# Altium PCB diff_probe.PcbDoc
Units mm, origin at the board's own origin, x right, y up, seen from the top; angles counter-clockwise.
Board outline 47.37 x 13.34 mm, 2 copper layers (Top Layer, Bottom Layer); 60 components, 36 nets, 183 pads, 7 vias.
Unrouted connection lines stored in the file: 139.
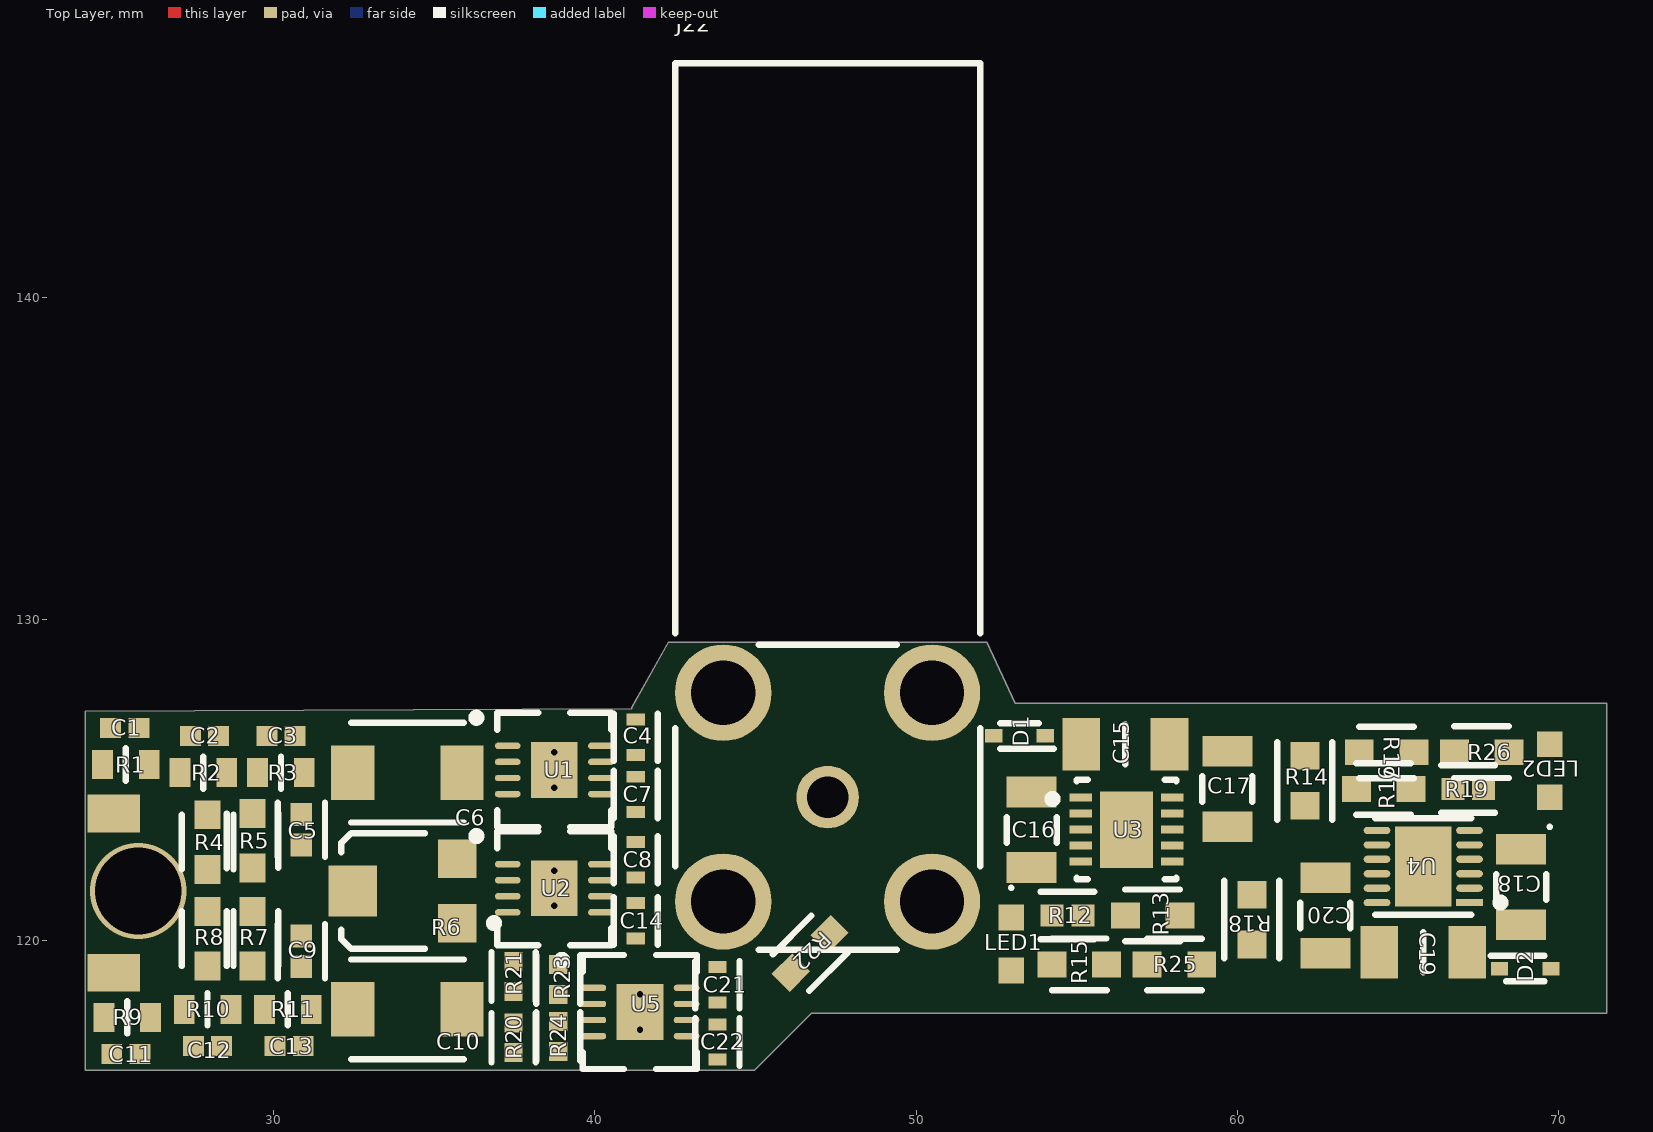
[diagram p0: Top Layer view]
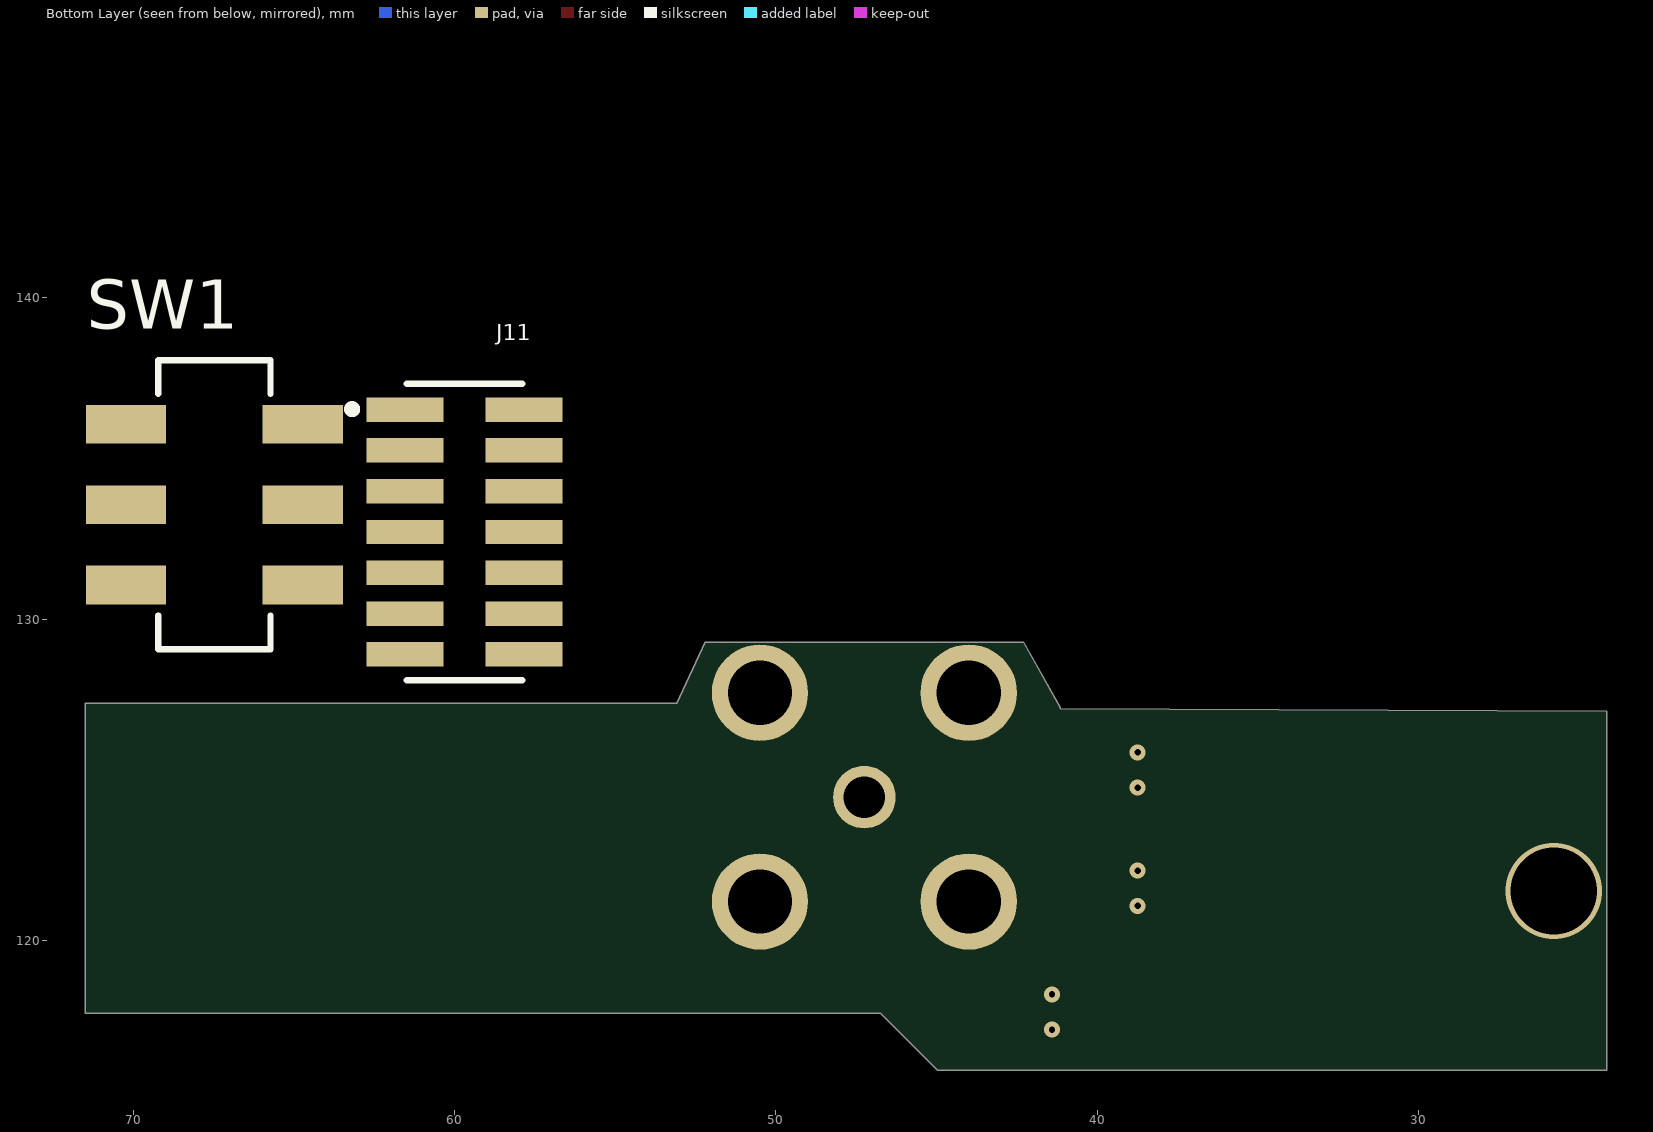
[diagram p1: Bottom Layer view, seen from below]

## Layer stack, top to bottom
Top Solder: solder mask 0.0102, Solder Resist, Dk 3.5
Top Layer: signal copper 0.0356
Dielectric 1: dielectric 0.32, FR-4, Dk 4.8
Bottom Layer: signal copper 0.0356
Bottom Solder: solder mask 0.0102, Solder Resist, Dk 3.5

## Board outline
44.958,115.951 46.736,117.729 71.501,117.729 71.501,127.378 53.086,127.378 52.197,129.286 42.291,129.286 41.15,127.256 41.15,127.217 24.13,127.127 24.13,115.951

## Design rules (kind name [scope] priority, off if disabled: settings)
Clearance [All] p1: gap=0.254 ignorepadtopadclearanceinfootprint=FALSE
PolygonConnect [All] p1: connectstyle=Relief reliefconductorwidth=0.254 reliefentries=4 polygonreliefangle="90 Angle" airgapwidth=0.254
RoutingVias [All] p1: holewidth=0.711 width=1.27 viastyle="Through Hole" minholewidth=0.711 minwidth=1.27 maxholewidth=0.711 maxwidth=1.27
SolderMaskExpansion [All] p1: expansion=0 istentingtop=FALSE
SupplyNets "Schematic Supply Nets_2" [InNet('-3,3')] p1: voltage=0.000
SupplyNets "Schematic Supply Nets_1" [InNet('+3,3')] p2: voltage=0.000
SupplyNets "Schematic Supply Nets" [InNet('GND')] p3: voltage=0.000
Width [All] p1: maxlimit=0.254 minlimit=0.254 preferedwidth=0.254
30 further rules are at their usual default settings.

## Classes and differential pairs
component class U_supply: C15 C16 C17 C18 C19 C20 D1 D2 J11 LED1 LED2 R12 R13 R14 R15 R16 R17 R18 R19 R25 R26 SW1 U3 U4
component class U_diff_amp: 2 C21 C22 J22 R20 R21 R22 R23 R24 U5
component class U_attenuation_stage: C1 C2 C3 C4 C5 C6 C7 C8 C9 C10 C11 C12 C13 C14 R1 R2 R3 R4 R5 R6 R7 R8 R9 R10 R11 U1 U2

## Components (designator, comment, footprint, x,y, rotation, side; value= is the part's Value field where it differs from the comment)
C1 "C0402C100C5GACAUTO" CAPC1005X65N 25.363,126.619 r0 top
C2 "C0402C100C5GACAUTO" CAPC1005X65N 27.844,126.365 r0 top
C3 "C0402C100C5GACAUTO" CAPC1005X65N 30.226,126.365 r0 top
C4 "CGA2B3X7R1E104K050BB" FP-CGA2B-IPC_B 41.275,126.323 r270 top
C5 "GRT1555C1H511FA02D" FP-GRT155-0_05-IPC_A 30.861,123.444 r270 top
C6 "JR200" CAPM3531X35N 34.163,125.222 r180 top
C7 "CGA2B3X7R1E104K050BB" FP-CGA2B-IPC_B 41.275,124.545 r90 top
C8 "CGA2B3X7R1E104K050BB" FP-CGA2B-IPC_B 41.275,122.513 r270 top
C9 "GRT1555C1H511FA02D" FP-GRT155-0_05-IPC_A 30.861,119.663 r270 top
C10 "JR200" CAPM3531X35N 34.163,117.856 r0 top
C11 "C0402C100C5GACAUTO" CAPC1005X65N 25.4,116.459 r0 top
C12 "C0402C100C5GACAUTO" CAPC1005X65N 27.94,116.713 r180 top
C13 "C0402C100C5GACAUTO" CAPC1005X65N 30.48,116.713 r0 top
C14 "CGA2B3X7R1E104K050BB" FP-CGA2B-IPC_B 41.275,120.608 r90 top
C15 "MCASE31LBB7226MTNA01" CAPC3214X190N 56.515,126.111 r0 top
C16 "CGA4J1X7R1E475K125AE" FP-CGA4J-IPC_A 53.594,123.444 r270 top
C17 "CGA4J1X7R1E475K125AE" FP-CGA4J-IPC_A 59.69,124.714 r90 top
C18 "CGA4J1X7R1E475K125AE" FP-CGA4J-IPC_A 68.834,121.666 r270 top
C19 "MCASE31LBB7226MTNA01" CAPC3214X190N 65.786,119.634 r0 top
C20 "CGA4J1X7R1E475K125AE" FP-CGA4J-IPC_A 62.738,120.777 r270 top
C21 "CGA2B3X7R1E104K050BB" FP-CGA2B-IPC_B 43.815,118.618 r270 top
C22 "CGA2B3X7R1E104K050BB" FP-CGA2B-IPC_B 43.815,116.84 r90 top
D1 "RB521S-30" SODFL1608X77N 53.213,126.365 r180 top
D2 "RB521S-30" SODFL1608X77N 68.961,119.126 r0 top
J11 "62101421021" 62101421021 59.69,132.715 r270 bottom
J22 "60711002241501" 60711002241501 -1222.756,1394.46 r90 top
LED1 "APT1608SEC_J3-AMT" APT1608SECJ3AMT 52.959,119.888 r270 top
LED2 "APT1608SEC_J3-AMT" APT1608SECJ3AMT 69.723,125.285 r90 top
R1 "ERA-3AEB334V" FP-ERA3A-MFG 25.4,125.476 r0 top
R2 "ERA-3AEB334V" FP-ERA3A-MFG 27.813,125.222 r0 top
R3 "ERA-3AEB334V" FP-ERA3A-MFG 30.226,125.222 r0 top
R4 "RT0603BRD076K49L" FP-RT0603-MFG 27.94,123.063 r90 top value=6.49KΩ
R5 "RT0603BRD0721R5L" FP-RT0603-MFG 29.337,123.102 r90 top value=21.5Ω
R6 "TC33X-2-103E" BOUR-TC33X-2_V 33.909,121.539 r180 top
R7 "RT0603BRD0721R5L" FP-RT0603-MFG 29.337,120.054 r90 top value=21.5Ω
R8 "RT0603BRD076K49L" FP-RT0603-MFG 27.94,120.054 r90 top value=6.49KΩ
R9 "ERA-3AEB334V" FP-ERA3A-MFG 25.437,117.602 r0 top
R10 "ERA-3AEB334V" FP-ERA3A-MFG 27.94,117.856 r180 top
R11 "ERA-3AEB334V" FP-ERA3A-MFG 30.443,117.856 r0 top
R12 "AC0402FR-7W1K2L" FP-AC0402-IPC_A 54.708,120.777 r0 top
R13 "RT0603BRE07100KL" FP-RT0603-MFG 57.365,120.777 r180 top value=100KΩ
R14 "AT0603FRE0733K2L" FP-AT0603-IPC_B 62.103,124.968 r90 top
R15 "RT0603BRD1310KL" FP-RT0603-MFG 55.079,119.253 r180 top value=10KΩ
R16 "RT0603BRE07100KL" FP-RT0603-MFG 64.555,124.714 r180 top value=100KΩ
R17 "RT0603BRD1310KL" FP-RT0603-MFG 64.643,125.857 r0 top value=10KΩ
R18 "AT0603FRE0733K2L" FP-AT0603-IPC_B 60.452,120.65 r270 top
R19 "AC0402FR-7W1K2L" FP-AC0402-IPC_A 67.183,124.714 r180 top
R20 "RG1005N-4020-W-T5" FP-RG1005-IPC_B 37.465,116.969 r270 top
R21 "RG1005N-4020-W-T5" FP-RG1005-IPC_B 37.465,118.874 r270 top
R22 "RT0603BRE0749R9L" FP-RT0603-MFG 46.702,119.6 r45 top value=49.9Ω
R23 "RG1005N-4020-W-T5" FP-RG1005-IPC_B 38.862,118.786 r270 top
R24 "RG1005N-4020-W-T5" FP-RG1005-IPC_B 38.862,117.008 r90 top
R25 "RT0603BRE07100KL" FP-RT0603-MFG 58.039,119.253 r0 top value=100KΩ
R26 "RT0603BRE07100KL" FP-RT0603-MFG 67.603,125.857 r180 top value=100KΩ
SW1 "452406020024" 452406020024 67.481,133.564 r270 bottom
U1 "ADA4817-1ACPZ-R7" ADI-CP-8-2_L 38.735,125.307 r0 top
U2 "ADA4817-1ACPZ-R7" ADI-CP-8-2_L 38.735,121.624 r0 top
U3 "LT3045EDD#PBF" FP-LT3045EDD#PBF-MFG 56.543,123.452 r0 top
U4 "LT3094EDD#PBF" FP-DD-12-05-08-1725-IPC_B 65.786,122.301 r180 top
U5 "ADA4817-1ACPZ-R7" ADI-CP-8-2_L 41.402,117.772 r0 top

## Footprints (in the part's own frame and the unit in brackets; to place one, negate y for a bottom-side part, rotate by r counter-clockwise, add the part's x,y. Pads: shape width x height; smd on the part's side, far side on the other; paste and mask are expansions set on the pad)
62101421021 [mm] "Pin Header, pitch 1.27 mm, SMD, Vertical, dual row, 14p"
  rect 0.76x2.4 smd: 1(-3.81,-1.85) 2(-3.81,1.85) 3(-2.54,-1.85) 4(-2.54,1.85) 5(-1.27,-1.85) 6(-1.27,1.85) 7(0,-1.85) 8(0,1.85) 9(1.27,-1.85) 10(1.27,1.85) 11(2.54,-1.85) 12(2.54,1.85) 13(3.81,-1.85) 14(3.81,1.85)
  silkscreen extent -4.62,-3.63 4.62,1.8, body extent -4.44,-2.5 4.45,2.5, height 5.9
452406020024 [mm] "SMT Mini Slide Switch, Same Side Connection, body 9.00 x 3.50 mm"
  rect 1.2x2.5 smd: 1(2.5,2.75) 2(0,2.75) 3(-2.5,2.75) 4(2.5,-2.75) 5(0,-2.75) 6(-2.5,-2.75)
  silkscreen extent -4.5,-1.75 4.5,1.75, body extent -4.52,-3.75 4.52,3.75, height 5.5
60711002241501 [mm] "BNC PCB THT Jack"
  round 1.95 hole 1.3: 1(-1270,-1270)
  round 3 hole 2: 2(-1273.25,-1266.75) 3(-1266.75,-1266.75) 4(-1266.75,-1273.25) 5(-1273.25,-1273.25)
  silkscreen extent -1274.75,-1274.75 -1247.15,-1265.25, body extent -1274.75,-1274.85 -1247.15,-1265.15, height 12
ADI-CP-8-2_L [mm] "QFN, 8-Leads, Body 3x3mm, Pitch 0.5mm, Thermal Pad 1.45X1.74mm, IPC High Density"
  oval 0.8x0.2 smd: 1(-1.45,0.75) 2(-1.45,0.25) 3(-1.45,-0.25) 4(-1.45,-0.75) 5(1.45,-0.75) 6(1.45,-0.25) 7(1.45,0.25) 8(1.45,0.75)
  rect 1.45x1.74 smd: 9(0,0)
  silkscreen extent -2.55,-1.78 1.78,1.78, body extent -1.63,-1.63 1.63,1.63, height 0.9
APT1608SECJ3AMT [mm]
  rect 0.8x0.8 smd: 1(-0.825,0) 2(0.825,0)
  silkscreen extent -1.8,-0.05 -1.7,0.05, body extent -0.8,-0.4 0.81,0.4, height 0.75
BOUR-TC33X-2_V [mm] "SMD, 3-Leads, Body 3.8x3.6mm"
  rect 1.2x1.2 smd: 1(-1.8,1) 3(-1.8,-1)
  rect 1.5x1.6 smd: 2(1.45,0)
  silkscreen extent -3.08,-1.8 1.8,1.8, body extent -2,-1.8 1.96,1.8, height 1.15
CAPC1005X65N [mm]
  rect 0.65x0.62 smd: 1(-0.44,0) 2(0.44,0)
  body extent -0.5,-0.25 0.5,0.25, height 0.65
CAPC3214X190N [mm]
  rect 1.17x1.63 smd: 1(-1.37,0) 2(1.37,0)
  silkscreen extent 0,-0.63 0,0.63, body extent -1.6,-0.72 1.6,0.72, height 1.9
CAPM3531X35N [mm]
  rect 1.35x1.7 smd: 1(-1.7,0) 2(1.7,0)
  silkscreen extent -1.75,-1.55 1.75,1.55, body extent -1.75,-1.55 1.75,1.55, height 0.35
FP-AC0402-IPC_A [mm]
  rect 0.715x0.672 smd paste+0 mask+0: 1(-0.479,0) 2(0.479,0)
  silkscreen extent -0.84,-0.74 0.84,0.74, body extent -1.04,-0.54 1.04,0.54, height 0.25
FP-AT0603-IPC_B [mm]
  rect 0.859x0.912 smd paste+0 mask+0: 1(-0.777,0) 2(0.777,0)
  silkscreen extent -1.21,-0.86 1.21,0.86, body extent -1.46,-0.71 1.46,0.71, height 0.25
FP-CGA2B-IPC_B [mm]
  rect 0.372x0.572 smd paste+0 mask+0: 1(-0.55,0) 2(0.55,0)
  silkscreen extent -0.74,-0.69 0.74,0.69, body extent -0.89,-0.44 0.89,0.44, height 0.25
FP-CGA4J-IPC_A [mm]
  rect 0.956x1.556 smd paste+0 mask+0: 1(-1.175,0) 2(1.175,0)
  silkscreen extent -0.4,-0.78 0.4,0.78, body extent -2.15,-1.28 2.15,1.28, height 0.25
FP-DD-12-05-08-1725-IPC_B [mm]
  rect 0.831x0.222 smd paste+0 mask+0: 1(-1.441,1.125)
  rrect100% 0.831x0.222 smd paste+0 mask+0: 2(-1.441,0.675) 3(-1.441,0.225) 4(-1.441,-0.225) 5(-1.441,-0.675) 6(-1.441,-1.125) 7(1.441,-1.125) 8(1.441,-0.675) 9(1.441,-0.225) 10(1.441,0.225) 11(1.441,0.675) 12(1.441,1.125)
  rect 1.75x2.48 smd paste-1000 mask+0: 13(0,0)
  silkscreen extent -2.53,-1.5 1.5,1.5, body extent -2.11,-1.75 2.11,1.75, height 0.25
FP-ERA3A-MFG [mm]
  rect 0.65x0.9 smd paste+0 mask+0: 1(-0.725,0) 2(0.725,0)
  silkscreen extent 0,-0.5 0,0.5, body extent -1.15,-0.6 1.15,0.6, height 0.25
FP-GRT155-0_05-IPC_A [mm]
  rect 0.715x0.672 smd paste+0 mask+0: 1(-0.479,0) 2(0.479,0)
  silkscreen extent -0.84,-0.74 0.84,0.74, body extent -1.04,-0.54 1.04,0.54, height 0.25
FP-LT3045EDD#PBF-MFG [mm]
  rect 0.7x0.25 smd paste+0 mask+0: 1(-1.425,1) 2(-1.425,0.5) 3(-1.425,0) 4(-1.425,-0.5) 5(-1.425,-1) 6(1.425,-1) 7(1.425,-0.5) 8(1.425,0) 9(1.425,0.5) 10(1.425,1)
  rect 1.65x2.38 smd paste+0 mask+0: 11(0,0)
  silkscreen extent -2.42,-1.55 1.55,1.55, body extent -1.88,-1.65 1.88,1.65, height 0.25
FP-RG1005-IPC_B [mm]
  rect 0.589x0.572 smd paste+0 mask+0: 1(-0.464,0) 2(0.464,0)
  silkscreen extent -0.76,-0.69 0.76,0.69, body extent -0.91,-0.44 0.91,0.44, height 0.25
FP-RT0603-MFG [mm]
  rect 0.9x0.8 smd paste+0 mask+0: 1(-0.85,0) 2(0.85,0)
  silkscreen extent -0.85,-0.81 0.86,0.8, body extent -1.4,-0.55 1.4,0.55, height 0.25
SODFL1608X77N [mm]
  rect 0.54x0.42 smd: 1(-0.8,0) 2(0.8,0)
  silkscreen extent -1.07,-0.4 0.6,0.4, body extent -0.8,-0.4 0.8,0.4, height 0.77

## Part data
C1 C2 C3 C11 C12 C13: "Capacitor", Manufacturer_Name="Yageo Group", Mouser Part Number=80-C0402C100C5GAUTO, Arrow Part Number=C0402C100C5GACAUTO, Arrow Price/Stock=https://www.arrow.com/en/products/c0402c100c5gacauto/kemet-corporation?region=nac, Datasheet Link=https://www.arrow.com/en/products/c0402c100c5gacauto/kemet-corporation?region=nac, Height=0.65mm, Manufacturer_Part_Number=C0402C100C5GACAUTO, Mouser Price/Stock=https://www.mouser.co.uk/ProductDetail/KEMET/C0402C100C5GACAUTO?qs=jI8Gez59nxIdSgXSmqmKxg%3D%3D
C4 C7 C8 C14 C21 C22: library part CMP-2000-06086-2, "Cap Ceramic 100nF 25V X7R 10% Pad SMD 0402 +125°C Automotive T/R", Capacitance=100nF, Case Code (Imperial)=0402, Case Code (Metric)=1005, Dielectric=X7R, Max Operating Temperature=125°C, Min Operating Temperature=-55°C, Package Quantity=1, Ratings=AEC-Q200, Tolerance=10%, Voltage=25V, Case/Package=0402, Composition=Ceramic, Depth=0.5mm, Height=0.5mm, Lead Free="Lead Free", Length=1mm, Mount="Surface Mount", Packaging="Tape and Reel", REACH SVHC="No SVHC", Termination=SMD/SMT, Thickness=0.022inch, Voltage Rating=25V, Voltage Rating (DC)=25V, Weight=2.3E-05oz, Width=0.02inch
C5 C9: library part CMP-06035-032859-1, "Multi-Layer Ceramic Capacitor 510pF 50V C0G ±1% 0402 Paper T/R"
C6 C10: "Capacitor", Manufacturer_Name=Knowles, Mouser Part Number=768-JR200, Datasheet Link=https://datasheet.datasheetarchive.com/originals/distributors/DKDS-39/7593.pdf, Height=0.35mm, Manufacturer_Part_Number=JR200, Mouser Price/Stock=https://www.mouser.co.uk/ProductDetail/Knowles-Voltronics/JR200?qs=Xqu1B%2Fs4UobrJFNnt%2FmsIw%3D%3D
C15 C19: "Capacitor", Manufacturer_Name="TAIYO YUDEN", Datasheet Link=https://www.mouser.in/datasheet/3/940/1/c_mlcc_C_e.pdf, Height=1.9mm, Manufacturer_Part_Number=MCASE31LBB7226MTNA01
C16 C17 C18 C20: library part CMP-08246-002248-1, "Cap Ceramic 4.7uF 25V X7R 10% Pad SMD 0805 +125°C Automotive T/R", Capacitance=4.7uF, Case Code (Imperial)=0805, Case Code (Metric)=2012, Max Operating Temperature=125°C, Min Operating Temperature=-55°C, Ratings=AEC-Q200, Tolerance=10%, Voltage Rating=25V, Case/Package=0805, Features="Soft Termination", Length=0.079inch, Mount="Surface Mount", Packaging="Tape and Reel", Thickness=0.059inch, Width=0.047inch
D1 D2: "Schottky Diode", Manufacturer_Name="Comchip Technology", Mouser Part Number=750-RB521S-30, Datasheet Link=https://www.mouser.in/datasheet/3/819/1/RB521S_30_RevC543202.pdf, Height=0.77mm, Manufacturer_Part_Number=RB521S-30, Mouser Price/Stock=https://www.mouser.co.uk/ProductDetail/Comchip-Technology/RB521S-30?qs=2qJf6qQ4IOKtVSsHa5L7cw%3D%3D
J11: library part CMP-1502-00928-4, "Conn, Header, 14Pos, 2Row, 1.27Mm Rohs Compliant: Yes", Contact Resistance=20mΩ, Current Rating=1A, Operating Supply Voltage=100V, Gender=Male, Lead Pitch=1.27mm, Number of Pins=14, Orientation=Vertical, RoHS=Non-Compliant
J22: library part CMP-03913-154947495-1, "Rf Coax Conn, Smc R/a Jack, 50 Ohm, Pcb Rohs Compliant: Yes"
LED1 LED2: "LED", Arrow Part Number=APT1608SEC/J3-AMT, Manufacturer_Name=Kingbright, Mouser Part Number=604-APT1608SEC/J3AMT, Arrow Price/Stock=https://www.arrow.com/en/products/apt1608secj3-amt/kingbright?utm_currency=USD&region=nac, Datasheet Link=https://www.kingbrightusa.com/images/catalog/SPEC/APT1608SEC-J3-AMT.pdf, Height=0.85mm, Manufacturer_Part_Number=APT1608SEC/J3-AMT, Mouser Price/Stock=https://www.mouser.co.uk/ProductDetail/Kingbright/APT1608SEC-J3-AMT?qs=0pUdBCiL%2F4PrQrm2zkbL8w%3D%3D
R1 R2 R3 R9 R10 R11: library part CMP-2000-00042-2, Case Code (Imperial)=0603, Case Code (Metric)=1608, Max Operating Temperature=155°C, Max Power Dissipation=100mW, Min Operating Temperature=-55°C, Resistance=330kΩ, Temperature Coefficient=25ppm/°C, Tolerance=0.1%, Voltage Rating=75V, Case/Package=0603, Composition="Metal Film, Thin Film", Contact Plating=Tin, Depth=800µm, Features="Automotive AEC-Q200", Height=450µm, Lead Free="Lead Free", Length=1.6mm, Lifecycle Status=Production, Military Standard=Not, Mount="Surface Mount", NexarPartId=1240193, Number of Pins=2, Number of Terminations=2, Packaging="Tape & Reel", Power Rating=100mW, Radiation Hardening=No, REACH SVHC="No SVHC", RoHS=Compliant, Schedule B="8533210045, 8533210045", Termination=SMD/SMT, Voltage Rating (DC)=75V, Width=800µm
R4 R8: library part CMP-2000-04494-2, "RES 6.49K OHM 1/10W .1% SMD 0603", Manufacturer=Yageo, Package=RT0603, Power Rating=0.1W, Resistance=6.49KΩ, Temperature="-55°C to +155°C", Temperature Coefficient="25 ppm/°C", Temperature Range High=+155°C, Temperature Range Low=-55°C, Tolerance=0.001, Voltage Rating=75V, Automotive=No, Category=Res, ComponentLink2Description=Datasheet, ComponentLink2URL=http://www.yageo.com/documents/recent/PYu-RT_1-to-0.01_RoHS_L_9.pdf, Composition="Thin Film", Device Class L1="Passive Components", Device Class L2=Resistors, Device Class L3="Chip SMD Resistors", Digikey Description="RES 6.49K OHM 1/10W .1% SMD 0603", Footprint Url=http://www.yageo.com/exep/pages/download/literatures/PYu-R_Mount_10.pdf, Height=0.55mm, Ipc Land Pattern Name=RESC16080X45, Lead Free=Yes, Manufacturer Part Number=RT0603BRD076K49L, Mouser Description="Thin Film Resistors - SMD 1/10W 6.49K ohm .1% 25ppm", Octopart=https://octopart.com/rt0603brd076k49l-yageo-1437223, RoHS=TRUE, Series=RT
R5 R7: library part CMP-03412-004607-1, "RES SMD 21.5 OHM 0.1% 1/10W 0603", Manufacturer=Yageo, Package=RT0603, Power Rating=0.1W, Resistance=21.5Ω, Temperature="-55°C to +155°C", Temperature Coefficient="25 ppm/°C", Temperature Range High=+155°C, Temperature Range Low=-55°C, Tolerance=0.001, Voltage Rating=75V, Automotive=No, Category=Res, ComponentLink2Description=Datasheet, ComponentLink2URL=http://www.yageo.com/documents/recent/PYu-RT_1-to-0.01_RoHS_L_9.pdf, Composition="Thin Film", Device Class L1="Passive Components", Device Class L2=Resistors, Device Class L3="Chip SMD Resistors", Digikey Description="RES SMD 21.5 OHM 0.1% 1/10W 0603", Footprint Url=http://www.yageo.com/exep/pages/download/literatures/PYu-R_Mount_10.pdf, Height=0.55mm, Ipc Land Pattern Name=RESC16080X45, Lead Free=Yes, Manufacturer Part Number=RT0603BRD0721R5L, Mouser Description="Thin Film Resistors - SMD 1/10W 21.5 ohm .1% 25ppm", Octopart=https://octopart.com/rt0603brd0721r5l-yageo-1419580, RoHS=TRUE, Series=RT
R6: library part CMP-2100-03695-1, "Trimming Potentiometer, 10000 Ohm, -40 to 100 degC, 3-Pin SMD, RoHS, Tape and Reel", Case/Package=SMD/SMT, Colour=Silver, Manufacturer=Bourns, Max Operating Temperature=100degC, Max Power Dissipation=100mW, Min Operating Temperature=-40degC, Mouser Part Number=652-TC33X-2-301E, Package Description="3-Pin Surface Mount Device, Body 3.8 x 3.6 mm", Package Quantity=2500, Package Reference=TC33X-2, Resistance=10KOhm, Temperature Coefficient=250ppm/degreesC, Tolerance=25%, Voltage Rating (DC)=50V, Composition=Potentiometer, Contact Plating=Silver, Datasheet URL=http://www.bourns.com/docs/Product-Datasheets/TC33.pdf, Datasheet Version=42583.0, Depth=3.8mm, Height=0.047inch, Lead Free=LeadFree, Length=3mm, Manufacturer URL=http://www.bourns.com/, Military Standard=Not, Mount=SurfaceMount, Mouser Nr=652-TC33X-2-301E, Number of Turns=1, Packaging=TapeandReel, Power Rating=100mW, Radiation Hardening=No, REACH SVHC=NoSVHC, RoHSCompliant=true, Taper=Linear, Termination=FootPrint, Weight=29.4mg, Width=0.118inch
R12 R19: library part CMP-03412-048489-1, "RES 1.2kΩ ±1% 0.125W 0402"
R13 R16: library part CMP-2000-04515-2, "RES SMD 100K OHM 0.1% 1/10W 0603", Manufacturer=Yageo, Mouser Part Number=71-PTN0603E1003BBT1, Package=RT0603, Power Rating=0.1W, Resistance=100KΩ, Temperature="-55°C to +155°C", Temperature Coefficient="50 ppm/°C", Temperature Range High=+155°C, Temperature Range Low=-55°C, Tolerance=0.001, Voltage Rating=75V, Automotive=No, Category=Res, ComponentLink2Description=Datasheet, ComponentLink2URL=http://www.yageo.com/documents/recent/PYu-RT_1-to-0.01_RoHS_L_9.pdf, Composition="Thin Film", Device Class L1="Passive Components", Device Class L2=Resistors, Device Class L3="Chip SMD Resistors", Digikey Description="RES SMD 100K OHM 0.1% 1/10W 0603", Footprint Url=http://www.yageo.com/exep/pages/download/literatures/PYu-R_Mount_10.pdf, Height=0.55mm, Ipc Land Pattern Name=RESC16080X45, Lead Free=Yes, Manufacturer Part Number=RT0603BRE07100KL, Octopart=https://octopart.com/rt0603bre07100kl-yageo-1377021, RoHS=TRUE, Series=RT
R14 R18: library part CMP-03412-041587-1, "Thin Film Chip Resistors Automotive Grade 33.2kΩ 1% 50ppm/°C 0603", Mouser Part Number=660-RN73H1JTD3322A05, RoHS Compliant=Yes
R15 R17: library part CMP-03412-009757-1, "RT0603 10KΩ 0.1W 25 ppm/°C 0.10%", Manufacturer=Yageo, Package=RT0603, Power Rating=0.1W, Resistance=10KΩ, Temperature="-55°C to +155°C", Temperature Coefficient="25 ppm/°C", Temperature Range High=+155°C, Temperature Range Low=-55°C, Tolerance=0.001, Voltage Rating=75V, Automotive=No, Category=Res, ComponentLink2Description=Datasheet, ComponentLink2URL=http://www.yageo.com/documents/recent/PYu-RT_1-to-0.01_RoHS_L_9.pdf, Composition="Thin Film", Device Class L1="Passive Components", Device Class L2=Resistors, Device Class L3="Chip SMD Resistors", Footprint Url=http://www.yageo.com/exep/pages/download/literatures/PYu-R_Mount_10.pdf, Height=0.55mm, Ipc Land Pattern Name=RESC16080X45, Lead Free=Yes, Manufacturer Part Number=RT0603BRD1310KL, Mouser Description="Res Thin Film 0603 10K Ohm 0.1% 1/10W ±25ppm/°C Molded SMD Paper T/R", Octopart=https://octopart.com/rt0603brd1310kl-yageo-30512336, RoHS=TRUE, Series=RT
R20 R21 R23 R24: library part CMP-28537-013757-1, "Automotive Metal Thin Film Chip Resistor, 0402, 402Ω, 0.05%, 10ppm/°C, 0.0625W, 75V", Case Code (Imperial)=0402, Case Code (Metric)=1005, Max Operating Temperature=155°C, Max Power Dissipation=63mW, Min Operating Temperature=-55°C, Package Quantity=5000, Power Rating=30mW, Resistance=402R, Resistor Type="Thin Film", Temperature Coefficient=10ppm/°C, Tolerance=0.05%, Voltage Rating=25V, Case/Package=0402, Features="Automotive AEC-Q200", Height=0.016inch, Lead Free="Lead Free", Length=0.039inch, Number of Terminations=2, Packaging="Tape and Reel", RoHS Compliant=Yes, Series=RG, Termination=SMD/SMT, Voltage Rating (DC)=25V, Width=0.5mm
R22: library part CMP-2000-04544-2, "RES SMD 49.9 OHM 0.1% 1/10W 0603", Manufacturer=Yageo, Package=RT0603, Power Rating=0.1W, Resistance=49.9Ω, Temperature="-55°C to +155°C", Temperature Coefficient="50 ppm/°C", Temperature Range High=+155°C, Temperature Range Low=-55°C, Tolerance=0.001, Voltage Rating=75V, Automotive=No, Category=Res, ComponentLink2Description=Datasheet, ComponentLink2URL=http://www.yageo.com/documents/recent/PYu-RT_1-to-0.01_RoHS_L_9.pdf, Composition="Thin Film", Device Class L1="Passive Components", Device Class L2=Resistors, Device Class L3="Chip SMD Resistors", Digikey Description="RES SMD 49.9 OHM 0.1% 1/10W 0603", Footprint Url=http://www.yageo.com/exep/pages/download/literatures/PYu-R_Mount_10.pdf, Height=0.55mm, Ipc Land Pattern Name=RESC16080X45, Lead Free=Yes, Manufacturer Part Number=RT0603BRE0749R9L, Mouser Description="RT Series 0603 0.1 W 49.9 kOhm ±0.1 % ±50 ppm/°C SMT Thin Film Chip Resistor", Octopart=https://octopart.com/rt0603bre0749r9l-yageo-1456229, RoHS=TRUE, Series=RT
R25 R26: library part CMP-2000-04515-2, "RES SMD 100K OHM 0.1% 1/10W 0603", Manufacturer=Yageo, Package=RT0603, Power Rating=0.1W, Resistance=100KΩ, Temperature="-55°C to +155°C", Temperature Coefficient="50 ppm/°C", Temperature Range High=+155°C, Temperature Range Low=-55°C, Tolerance=0.001, Voltage Rating=75V, Automotive=No, Category=Res, ComponentLink2Description=Datasheet, ComponentLink2URL=http://www.yageo.com/documents/recent/PYu-RT_1-to-0.01_RoHS_L_9.pdf, Composition="Thin Film", Device Class L1="Passive Components", Device Class L2=Resistors, Device Class L3="Chip SMD Resistors", Digikey Description="RES SMD 100K OHM 0.1% 1/10W 0603", Footprint Url=http://www.yageo.com/exep/pages/download/literatures/PYu-R_Mount_10.pdf, Height=0.55mm, Ipc Land Pattern Name=RESC16080X45, Lead Free=Yes, Manufacturer Part Number=RT0603BRE07100KL, Octopart=https://octopart.com/rt0603bre07100kl-yageo-1377021, RoHS=TRUE, Series=RT
SW1: library part CMP-03913-146831046-2, "WS-SLSV Mini Slide Switch", Insulation Resistance=100MΩ, Manufacturer Lifecycle Status=ACTIVE, Max Operating Temperature=85°C, Min Operating Temperature=-40°C, Contact Plating=Silver, Lifecycle Status=Production, RoHS=Compliant, YEOL="1 = Estimated lifetime > 10 years"
U1 U2 U5: library part CMP-0384-00096-1, "Single Channel Low Noise Operational Amplifier, 1.05 GHz BW, 870 V/us SR, Industrial, 8-pin QFN (CP-8-2), Reel", Amplifiers Per Package=1, Generic Part Number=ADA4817-1, Input Bias Current=2pA, Input Offset Voltage=2mV, Manufacturer="Analog Devices", ComponentLink1Description="Manufacturer URL", ComponentLink1URL=http://www.analog.com/en/index.html, ComponentLink2Description=Datasheet, ComponentLink2URL=http://www.analog.com/static/imported-files/data_sheets/ADA4817-1_4817-2.pdf, ComponentLink3Description="Package Specification", ComponentLink3URL=http://www.analog.com/static/imported-files/packages/56953322593982CP_8_2.pdf, DatasheetVersion="Rev. A", Iq/Amp=21mA, Mounting Technology="Surface Mount", PackageDescription="8-Pin Lead Frame Chip Scale Package, Body 3 x 3 mm, Pitch 0.5 mm", PackageReference=CP-8-2, PackageVersion=061507-B, PartNumber=ADA4817-1ACPZ-R7, Slew Rate=870V/us, Small Signal Bandwidth=1.05GHz, V Span Max=10V, V Span Min=5V
U3: library part CMP-09138-000240-1, "IC REG LINEAR 0V 500MA 10DFN", Case/Package=DFN, Dropout Voltage=260mV, Max Operating Temperature=125°C, Min Current Limit=570mA, Min Operating Temperature=-40°C, Output Current=500mA, Output Voltage=15V, Number of Regulators=1, RoHS Compliant=Yes, Series=-
U4: library part CMP-09138-000084-1, "IC REG LIN NEG ADJ 500MA 12DFN", RoHS Compliant=Yes

## Free pads (board coordinates)
  rect 1.63x1.17 smd: 1(25.019,123.952) 2(25.019,118.999)

## Via types
v1: diameter 0.5, hole 0.2, Top Layer to Bottom Layer, 6 vias
v2: diameter 3, hole 2.7, Top Layer to Bottom Layer, 1 vias

## Nets (pads, with @x,y where several pads share a name; then routed paths per layer and width w, separated by ;. In a path a pad name is that pad's centre, name@x,y a point inside that pad or via, vN(x,y) a via of type N, cw(c..) or ccw(c..) an arc to the next point about the centre after c; other vN are vias at no path point)
+3,3: C4.1 C8.1 C15.1 C21.1 U1.1 U1.8 U2.1 U2.8 U3.9 U3.10 U5.1 U5.8
-3,3: C7.1 C14.1 C19.1 C22.1 U1.5 U2.5 U4.10 U4.11 U4.12 U5.5
GND: C4.2 C5.2 C6.1 C7.2 C8.2 C9.1 C10.2 C14.2 C15.2 C16.1 C17.1 C18.2 C19.2 C20.2 C21.2 C22.2 D1.2 D2.1 J11.5 J11.6 J11.7 J11.8 J11.9 J11.10 J22.2 J22.3 J22.4 J22.5 R6.2 R14.1 R15.1 R17.1 R18.2 R19.1 R24.1 R25.2 R26.2 U1.9 U2.9 U3.5 U3.8 U3.11 U4.6 U4.9 U5.9
  other v1: 41.402,117.222 41.402,118.322 38.735,121.074 38.735,122.174 38.735,124.757 38.735,125.857
MIN1: C1.1 R1.1
MIN2: C11.1 R9.1
NetC1_2: C1.2 C2.1 R1.2 R2.1
NetC2_2: C2.2 C3.1 R2.2 R3.1
NetC3_2: C3.2 C5.1 C6.2 R3.2 R4.2 U1.4
NetC9_2: C9.2 C10.1 C13.2 R8.1 R11.2 U2.4
NetC11_2: C11.2 C12.1 R9.2 R10.1
NetC12_2: C12.2 C13.1 R10.2 R11.1
NetC16_2: C16.2 D1.1 J11.1 J11.2 J11.3 J11.4 R12.1 R13.2 SW1.2 U3.1 U3.2
NetC17_2: C17.2 R14.2 U3.7
NetC18_1: C18.1 D2.2 J11.11 J11.12 J11.13 J11.14 R16.2 SW1.5 U4.1 U4.2 U4.13
NetC20_1: C20.1 R18.1 U4.8
NetJ22_1: J22.1 R22.2
NetLED1_1: LED1.1 U3.4
NetLED1_2: LED1.2 R12.2
NetLED2_1: LED2.1 U4.4
NetLED2_2: LED2.2 R19.2
NetR4_1: R4.1 R5.2
NetR5_1: R5.1 R6.3
NetR6_1: R6.1 R7.2
NetR7_1: R7.1 R8.2
NetR13_1: R13.1 R15.2 U3.6
NetR16_1: R16.1 R17.2 U4.5
NetR20_1: R20.1 U5.2
NetR20_2: R20.2 R21.2 U5.3
NetR21_1: R21.1 U1.7
NetR22_1: R22.1 U5.7
NetR23_1: R23.1 U2.7
NetR23_2: R23.2 R24.2 U5.4
NetR25_1: R25.1 SW1.3 U3.3
NetR26_1: R26.1 SW1.6 U4.3
NetU1_2: U1.2 U1.3
NetU2_2: U2.2 U2.3
pads on no net: SW1.1 SW1.4 U1.6 U2.6 U4.7 U5.6
copper on no net:
  other v2: 25.781,121.539